# Altium PCB Car_wash_machine.PcbDoc (part 5 of 6)
Units mm, origin at the board's own origin, x right, y up, seen from the top; angles counter-clockwise.
Board outline 229.74 x 149.86 mm, 2 copper layers (Top Layer, Bottom Layer); 256 components, 170 nets, 868 pads, 731 vias.
Unrouted connection lines stored in the file: 362.
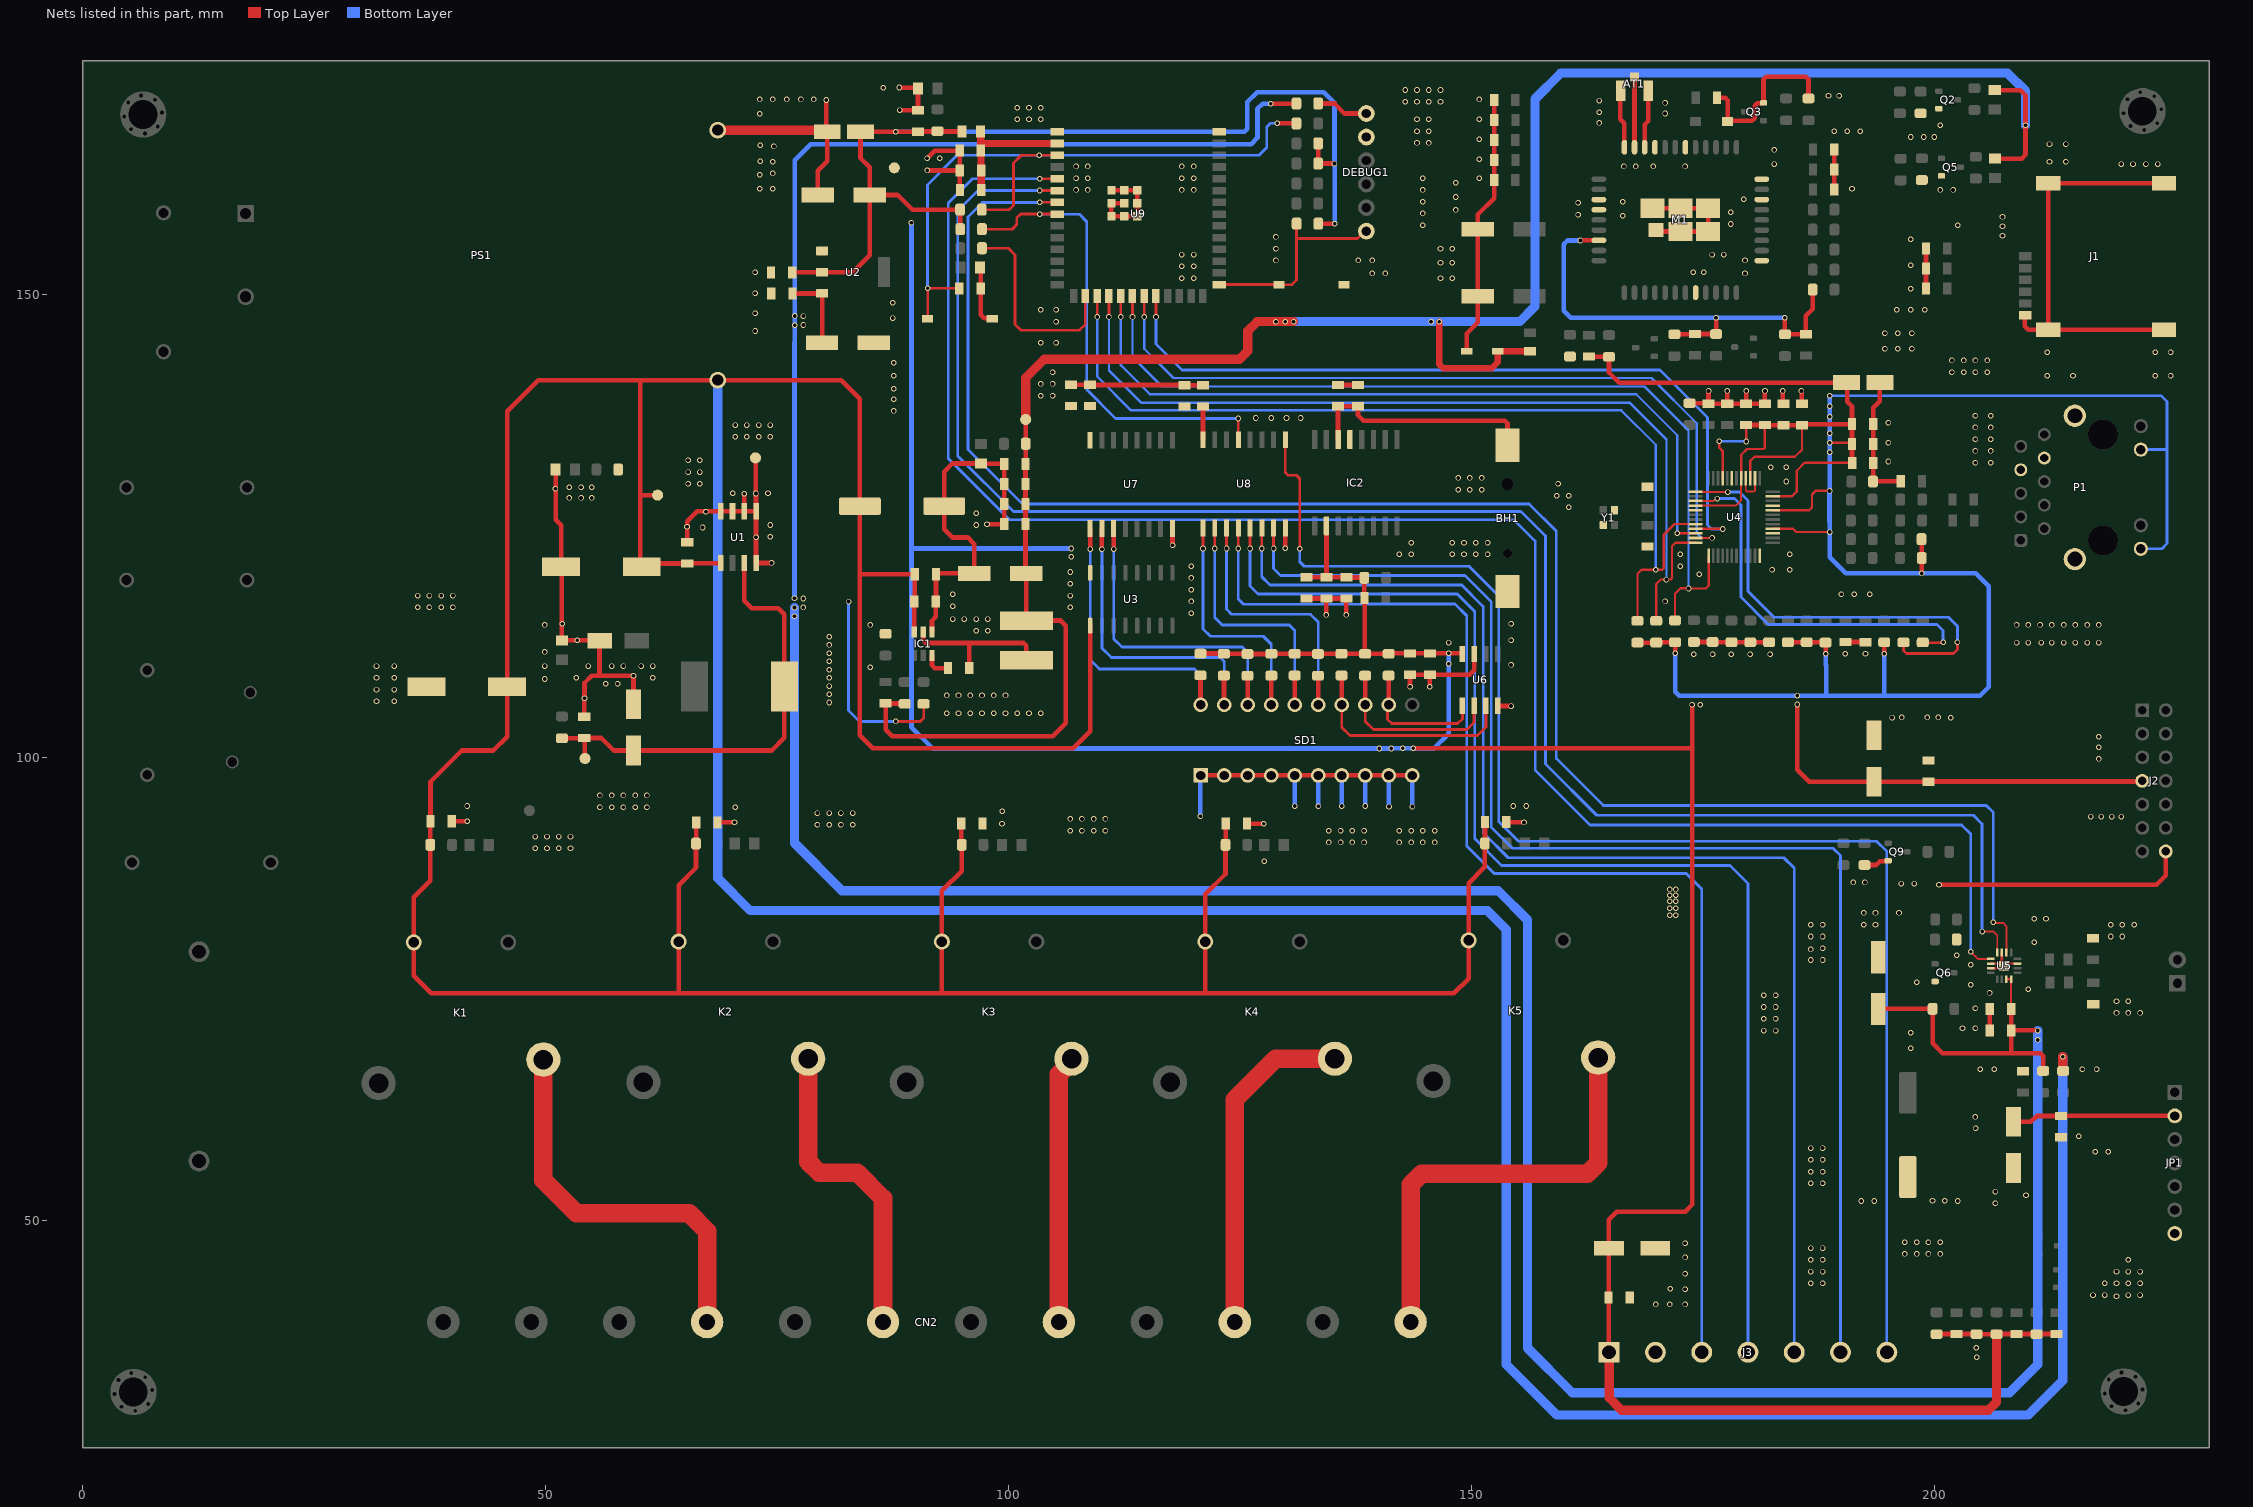
[diagram p2: the nets of this part, all layers, seen from the top]

## Via types
v1: diameter 0.6, hole 0.4, Top Layer to Bottom Layer, tented both sides, 730 vias
v2: diameter 0.6/0.6 (per signal layer), hole 0.4, Top Layer to Bottom Layer, tented both sides, 1 vias

## Nets (pads, with @x,y where several pads share a name; then routed paths per layer and width w, separated by ;. In a path a pad name is that pad's centre, name@x,y a point inside that pad or via, vN(x,y) a via of type N, cw(c..) or ccw(c..) an arc to the next point about the centre after c; other vN are vias at no path point) (continued)
ACTLED: (continued)
  Bottom Layer w0.3: v1(176.581,127.953) 178.422,127.953 179.133,127.241 179.133,117.31 182.093,114.351 200.304,114.351 200.977,113.678 v1(200.977,112.433)
BCLK: U5.16 U9.6 | length 195
  Top Layer w0.2: v1(205.194,81.178) 206.439,81.178 206.819,80.798 U5.16@206.819,78.905
  Top Layer w0.3: v1(103.391,161.226) U9.6@105.283,161.226
  Bottom Layer w0.3: v1(103.391,161.226) 96.723,161.226 94.526,159.029 94.526,132.575 100.546,126.555 155.385,126.555 158.013,123.927 158.013,99.289 163.563,93.739 204.267,93.739 205.194,92.812 v1(205.194,81.178)
BOOT_0: DEBUG1.6 R51.1 SW2.2 U9.27 | length 22.5
  Top Layer w0.3: U9.27@122.783,151.066 122.789,151.06 129.234,151.06 SW2.2@129.24,151.054 130.632,151.054 131.14,151.561 131.14,156.058 ; R51.1@131.14,157.645 131.14,156.058 ; DEBUG1.6@138.684,156.845 138.5,156.845 137.712,156.058 131.14,156.058
COM1: CN2.4 K1.COM | length 42.8
  Top Layer w2: K1.COM@49.774,67.35 49.774,54.315 53.353,50.736 65.519,50.736 67.462,48.794 CN2.4@67.462,38.989
COM2: CN2.6 K2.COM | length 34.2
  Top Layer w2: K2.COM@78.379,67.437 78.379,56.315 79.551,55.143 83.668,55.143 86.462,52.349 CN2.6@86.462,38.989
COM3: CN2.8 K3.COM | length 29
  Top Layer w2: CN2.8@105.462,38.989 105.462,65.77 106.827,67.135 K3.COM@106.827,67.437
COM4: CN2.10 K4.COM | length 36.7
  Top Layer w2: CN2.10@124.462,38.989 124.462,63.032 128.867,67.437 K4.COM@135.275,67.437
COM5: CN2.12 K5.COM | length 47.5
  Top Layer w2: CN2.12@143.462,38.989 143.462,53.845 144.634,55.016 162.551,55.016 163.723,56.188 K5.COM@163.723,67.564
DIN: U5.1 U9.5 | length 197.4
  Top Layer w0.2: v1@103.391,162.496 v1(103.391,162.509) ; v1(203.962,78.994) 204.736,78.22 U5.1@206.134,78.22
  Top Layer w0.3: v1@103.391,162.496 U9.5@105.283,162.496
  Bottom Layer w0.3: v1(103.391,162.509) 96.152,162.509 93.51,159.868 93.51,132.296 100.152,125.654 154.61,125.654 156.909,123.355 156.909,98.615 162.839,92.685 202.984,92.685 203.975,91.694 203.975,79.007 v1(203.962,78.994)
EN_MAIN: C54.2 R52.1 R80.1 SW1.2 U9.3 | length 75.2
  Top Layer w0.3: SW1.2@91.262,147.307 91.288,147.333 v1(91.288,150.66) 94.671,150.66 C54.2@94.71,150.622 ; R52.1@97.136,159.156 100.101,159.156 100.571,159.626 100.571,164.211 101.397,165.036 v1(103.34,165.036) U9.3@105.283,165.036
  Top Layer w0.5: v1(129.057,168.491) 129.07,168.478 131.108,168.478 R80.1@131.121,168.465
  Bottom Layer w0.3: v1(91.288,150.66) 91.262,150.685 91.262,161.823 94.475,165.036 v1(103.34,165.036) 127.063,165.036 127.927,165.9 127.927,168.11 128.308,168.491 v1(129.057,168.491)
ETH_CLK: U4.33 U9.22 | length 84.4
  Top Layer w0.25: U4.33@174.231,124.693 177.135,124.693 v1(177.165,124.663)
  Top Layer w0.3: U9.22@115.938,149.816 115.945,149.81 115.945,147.58 v1(115.951,147.574)
  Bottom Layer w0.3: v1(115.951,147.574) 115.951,144.653 118.77,141.834 170.396,141.834 175.514,136.715 175.514,125.095 175.946,124.663 v1(177.165,124.663)
ETH_INTN: R30.1 U4.36 U9.18 | length 98.6
  Top Layer w0.25: R30.1@169.989,114.745 169.989,117.792 169.977,117.805 169.977,118.701 170.478,119.202 171.551,119.202 171.697,119.349 171.697,122.802 172.088,123.193 U4.36@174.231,123.193
  Top Layer w0.3: U9.18@110.858,149.816 110.865,149.81 110.865,147.58 v1(110.871,147.574)
  Bottom Layer w0.25: v1(110.871,147.574) 110.871,141.783 114.338,138.316 167.107,138.316 171.088,134.335 v1(171.088,119.202)
ETH_MISO: U4.34 U9.19 | length 83.3
  Top Layer w0.25: U9.19@112.128,149.816 112.141,149.804 v1(112.141,147.574) ; v1(172.25,124.193) U4.34@174.231,124.193
  Bottom Layer w0.25: v1(112.141,147.574) 112.141,142.367 115.291,139.217 167.831,139.217 172.25,134.798 v1(172.25,124.193)
ETH_MOSI: U4.35 U9.21 | length 84.2
  Top Layer w0.25: U9.21@114.668,149.816 U9.21@114.681,149.804 ; U4.35@174.231,123.693 174.234,123.696 176.02,123.696 v1(176.022,123.698)
  Top Layer w0.3: v1(114.681,147.574) U9.21@114.681,149.804
  Bottom Layer w0.25: v1(114.681,147.574) 114.681,144.145 117.843,140.983 169.481,140.983 174.371,136.093 174.371,124.206 174.879,123.698 v1(176.022,123.698)
ETH_RST: R26.1 U4.37 U9.20 | length 97.1
  Top Layer w0.25: U9.20@113.398,149.816 U9.20@113.411,149.804 ; R26.1@172.022,114.776 172.022,117.669 172.615,118.262 173.457,118.262 v1(173.482,118.237) 175.333,118.237 175.661,118.565 U4.37@175.661,121.763
  Top Layer w0.3: v1(113.411,147.574) U9.20@113.411,149.804
  Bottom Layer w0.25: v1(113.411,147.574) 113.411,143.256 116.611,140.056 168.732,140.056 173.482,135.306 v1(173.482,118.237)
ETH_SCSN: R32.1 U4.32 U9.17 | length 101.3
  Top Layer w0.25: R32.1@167.957,114.745 167.97,114.757 167.97,119.837 168.402,120.269 v1@170.003,120.269 ; v1(169.926,120.269) 170.669,120.269 170.815,120.415 170.815,124.054 171.955,125.193 U4.32@174.231,125.193
  Top Layer w0.3: U9.17@109.588,149.816 109.595,149.81 109.595,147.58 v1(109.601,147.574)
  Bottom Layer w0.25: v1(109.601,147.574) 109.601,141.135 113.259,137.477 166.205,137.477 169.926,133.756 169.926,128.19 v1(169.926,120.269)
GND: AT1.2 BH1.2 C1.2 C2.2 C3.2 C4.2 C7.2 C8.2 C9.2 C10.2 C11.2 C12.2 C13.2 C14.2 C15.2 C16.1 C17.1 C18.1 C19.1 C20.1 C22.2 C23.1 C24.1 C25.1 C26.1 C27.1 C30.2 C31.2 C32.2 C33.2 C34.2 C37.2 C38.2 C39.2 C40.2 C41.2 C42.2 C43.2 C44.2 C45.2 C46.2 C47.2 C48.2 C49.2 C50.2 C51.2 C52.2 C53.2 C54.1 C55.2 C56.2 C57.2 C58.2 C59.2 C60.2 C61.2 C62.2 C63.2 C64.2 C65.2 C66.2 C68.2 C69.2 C73.2 C74.2 C75.2 C76.2 C77.2 C78.2 C79.2 C80.2 C81.2 C82.2 C83.2 C84.2 C85.2 C86.2 D1.1 D2.2 D3.2 D4.2 D5.2 D6.1 D8.1 D15.2 DEBUG1.2 EC1.2 EC2.2 EC3.2 EC4.2 EC5.2 EC6.2 GND.0@72.682,132.347 IC1.1 IC2.13 J1.C5 J1.G1 J1.G2 J1.G3 J1.G4 J3.2 JP1.7 M1.8 M1.13 M1.19 M1.21 M1.27 M1.30 M1.31 M1.33 M1.36 M1.37 M1.87 M1.88 M1.89 M1.90 M1.91 M1.92 P1.7 P1.8 P1.Shell PS1.3 Q2.2 Q3.2 Q5.2 Q6.2 Q9.2 R7.1 R13.2 R16.2 R18.2 R19.2 R24.2 R27.1 R36.1 R37.1 R38.1 R44.1 R48.1 R57.1 R83.1 SD1.1A SD1.2A SD1.3A SD1.4A SD1.5A SD1.6A SD1.7A SD1.8A SD1.9A SD1.10A SW1.1 SW2.1 U1.4 U1.5 U1.6 U1.7 U1.8 U2.1 U3.8 U4.3 U4.9 U4.14 U4.16 U4.19 U4.29 U4.48 U5.2 U5.3 U5.11 U5.15 U5.17 U6.4 U6.7 U7.8 U8.8 U9.1 U9.40 U9.41 U9.42 U9.43 U9.44 U9.45 U9.46 U9.47 U9.48 U9.49 Y1.2 Y1.4 | length 440.2
  Top Layer w0.2: U4.16@179.661,130.123 179.661,128.835 179.778,128.718 180.544,128.718 180.661,128.835 U4.14@180.661,130.123
  Top Layer w0.25: U5.3@206.134,77.22 207.319,77.22 U5.17@207.569,77.47 ; U5.2@206.134,77.72 U5.17@207.319,77.72 ; U5.15@207.319,78.905 U5.17@207.319,77.72 ; U5.11@209.004,77.72 207.819,77.72 U5.17@207.569,77.47 ; U5.17@207.319,77.72 U5.17@207.569,77.47
  Top Layer w0.5: C38.2@39.878,93.091 v1(41.542,93.091) ; D2.2@51.096,131.115 51.096,125.662 51.701,125.057 C1.2@51.701,120.587 51.778,120.51 D3.2@51.778,112.632 55.84,112.632 55.84,108.801 ; C4.2@54.191,104.388 54.204,104.401 54.204,106.375 v1(54.216,106.388) 54.216,108.026 54.991,108.801 55.84,108.801 ; C3.2@59.525,105.738 59.512,105.751 v1(59.512,108.801) 55.84,108.801 ; C2.2@65.316,123.242 65.316,125.501 66.395,126.58 U1.8@68.936,126.58 U1.7@70.206,126.58 U1.6@71.476,126.58 ; C42.2@68.587,92.964 68.593,92.97 70.415,92.97 v1(70.421,92.977) ; v1(71.476,128.486) U1.6@71.476,126.58 ; GND.0@72.682,132.347 72.733,132.296 v1@72.733,128.526 ; v1(72.733,128.499) 72.739,128.492 72.739,126.587 U1.5@72.746,126.58 ; v1(74.422,120.993) 72.758,120.993 U1.4@72.746,120.98 v1(72.746,123.78) U1.5@72.746,126.58 ; EC3.2@79.427,160.744 79.427,163.374 80.433,164.38 C75.2@80.433,167.576 C75.2@80.34,167.669 ; C75.2@80.263,167.746 C75.2@80.34,167.669 ; v1(80.34,171.005) C75.2@80.34,167.669 ; v1(88.211,172.355) 88.23,172.336 90.181,172.336 D5.2@90.254,172.263 90.244,172.252 90.244,169.898 C79.2@90.233,169.888 90.221,169.901 88.278,169.901 v1(88.265,169.913) ; v1(91.224,164.706) 92.05,165.532 C77.2@94.735,165.532 94.748,165.519 C76.2@94.748,163.386 ; v1(91.249,163.398) 91.262,163.386 C76.2@94.748,163.386 ; IC1.1@91.755,113.523 91.755,114.767 92.151,115.164 92.151,116.834 C8.2@92.146,116.84 92.184,116.878 C9.2@92.184,119.774 92.273,119.863 EC1.2@96.33,119.863 96.33,123.037 95.618,123.749 93.955,123.749 93.069,124.634 C7.2@93.069,127.127 93.069,130.864 93.946,131.741 D4.2@97.041,131.741 97.062,131.72 99.54,131.72 C13.2@99.561,131.699 C12.2@99.561,129.54 C11.2@99.561,127.381 C10.2@99.561,125.222 99.517,125.178 v1(97.695,125.178) ; C78.2@94.773,161.277 94.767,161.284 94.767,163.366 C76.2@94.76,163.373 C76.2@94.748,163.386 ; D15.2@96.926,152.933 97.01,152.85 C54.1@97.01,150.622 97.01,147.796 97.396,147.409 98.242,147.409 SW1.1@98.267,147.383 ; C55.2@106.794,140.24 C56.2@108.814,140.24 108.839,140.215 118.986,140.215 C57.2@119.012,140.19 C58.2@121.031,140.19 ; U9.42@111.133,161.256 U9.49@112.533,161.256 U9.48@113.933,161.256 U9.47@113.933,159.857 U9.46@113.933,158.457 U9.45@112.533,158.457 U9.44@111.133,158.457 U9.43@111.133,159.857 U9.41@112.533,159.857 ; U7.8@117.729,124.714 117.735,124.708 117.735,122.917 v1(117.742,122.911) ; SD1.1A@120.777,98.044 SD1.2A@123.317,98.044 SD1.3A@125.857,98.044 SD1.4A@128.397,98.044 SD1.5A@130.937,98.044 SD1.6A@133.477,98.044 SD1.7A@136.017,98.044 SD1.8A@138.557,98.044 ; C52.2@125.801,92.824 v1(127.597,92.824) ; v1(129.921,122.58) U8.8@129.921,124.765 ; C80.2@132.207,117.155 C81.2@134.366,117.155 ; v1(134.341,115.379) 134.353,115.392 134.353,117.143 C81.2@134.366,117.155 ; C73.2@135.611,140.222 C74.2@137.77,140.222 ; v1(136.512,115.379) 136.519,115.386 136.519,117.149 C82.2@136.525,117.155 C81.2@134.366,117.155 ; SD1.8A@138.557,98.336 SD1.8A@138.557,98.044 ; v1(143.396,107.62) 143.396,108.908 C60.2@143.383,108.921 C59.2@145.542,108.921 ; SD1.10A@143.65,98.057 SD1.10A@143.637,98.044 SD1.9A@141.097,98.044 SD1.8A@138.557,98.044 ; v1(145.529,107.62) 145.536,107.626 145.536,108.915 C59.2@145.542,108.921 ; D6.1@149.511,143.857 149.511,145.777 150.699,146.965 EC4.2@150.699,149.809 EC5.2@150.699,157.048 150.699,158.636 152.475,160.412 C20.1@152.475,162.382 152.478,162.386 152.478,164.538 C19.1@152.482,164.541 152.478,164.545 152.478,166.697 C18.1@152.475,166.7 152.478,166.704 152.478,168.856 C17.1@152.482,168.859 152.478,168.863 152.478,171.015 C16.1@152.475,171.018 ; U6.7@150.317,111.175 150.343,111.15 150.343,109.423 149.84,108.921 C59.2@145.542,108.921 ; U6.4@152.857,105.575 152.895,105.537 v1(154.305,105.537) ; C53.2@153.797,92.989 153.81,92.977 155.689,92.977 v1(155.702,92.964) ; AT1.2@166.165,171.996 166.116,171.947 166.116,168.91 166.543,168.483 M1.33@166.543,165.896 ; M1.31@168.743,165.896 168.743,168.362 169.115,168.734 AT1.2@169.115,171.996 ; M1.92@169.593,159.296 M1.91@172.593,159.296 M1.90@175.593,159.296 M1.89@175.593,156.796 M1.88@172.593,156.796 170.154,156.796 M1.87@169.972,156.978 ; R37.1@173.596,138.253 173.621,138.228 C27.1@175.603,138.228 ; R24.2@174.053,112.459 R19.2@176.085,112.459 176.101,112.443 178.102,112.443 R18.2@178.118,112.427 R16.2@180.149,112.427 R13.2@182.181,112.427 ; v1(175.641,139.573) 175.635,139.567 175.635,138.259 C27.1@175.603,138.228 ; C37.2@176.55,171.247 177.431,171.247 177.724,170.954 177.724,168.743 180.336,168.743 180.629,169.036 180.629,170.377 180.921,170.67 181.563,170.67 Q3.2@181.579,170.686 181.579,173.227 181.871,173.52 186.143,173.52 186.436,173.227 R44.1@186.436,171.171 ; v1(177.673,139.573) 177.673,138.215 C26.1@177.66,138.203 ; v1(179.705,139.573) 179.699,139.567 179.699,138.209 C45.2@179.689,138.199 ; v1(181.737,139.573) 181.731,139.567 181.731,138.202 C49.2@181.724,138.196 C45.2@179.692,138.196 C45.2@179.689,138.199 ; v1@183.642,139.546 183.642,138.259 C46.2@183.718,138.183 ; v1(185.674,139.573) 185.693,139.554 185.693,138.215 C50.2@185.725,138.183 ; C22.2@189.219,161.315 C23.1@189.219,163.474 C24.1@189.219,165.633 ; C34.2@190.424,112.457 190.43,112.451 192.576,112.451 C25.1@192.583,112.444 ; R83.1@192.494,88.36 193.732,88.36 194.161,88.789 194.99,88.789 Q9.2@195.04,88.839 ; R27.1@193.402,129.794 R27.1@193.415,129.807 ; C43.2@194.145,140.475 194.145,138.468 193.441,137.764 C44.2@193.441,136.004 C48.2@193.441,133.845 193.444,133.842 193.444,131.817 C47.2@193.448,131.813 193.425,131.791 193.425,129.817 R27.1@193.415,129.807 ; C33.2@196.404,129.819 196.391,129.807 R27.1@193.415,129.807 ; C32.2@199.123,150.62 C30.2@199.123,152.779 C31.2@199.123,154.938 ; C68.2@206.031,70.51 C69.2@206.031,72.796 ; J1.C5@209.832,147.76 209.804,147.732 209.804,146.558 210.162,146.2 J1.G1@212.332,146.2 ; J1.G3@224.852,146.2 J1.G1@212.332,146.2 ; J1.G4@224.852,162 J1.G2@212.332,162 J1.G1@212.332,146.2 ; U1.6@71.476,126.58 U1.5@72.746,126.58 ; C27.1@175.603,138.228 C27.1@175.628,138.203 C26.1@177.66,138.203 ; C26.1@177.66,138.203 177.664,138.199 C45.2@179.689,138.199
  Top Layer w1: PS1.3@68.612,167.746 C75.2@80.263,167.746
  Bottom Layer w0.5: v1(120.752,93.637) 120.752,98.019 SD1.1A@120.777,98.044 ; v1(130.937,94.729) SD1.5A@130.937,98.044 ; SD1.6A@133.477,98.044 133.49,98.031 133.49,94.729 v1(133.502,94.717) ; SD1.7A@136.017,98.044 136.023,98.038 136.023,94.736 v1(136.03,94.729) ; SD1.8A@138.557,98.044 138.563,98.038 138.563,94.748 v1(138.57,94.742) ; SD1.9A@141.097,98.044 141.11,98.031 141.11,94.691 v1(141.122,94.678) ; SD1.10A@143.637,98.044 143.643,98.038 143.643,94.685 v1(143.65,94.678)
  other v1: 169.926,40.894 171.45,40.894 173.101,40.894 219.71,41.783 217.17,41.91 218.44,41.91 220.98,41.91 222.25,41.91 173.101,42.545 171.513,42.596 186.69,43.18 187.96,43.18 218.44,43.18 219.71,43.18 220.98,43.18 222.25,43.18 173.101,44.196 186.69,44.45 187.96,44.45 219.71,44.45 220.98,44.45 222.25,44.45 186.69,45.72 187.96,45.72 220.98,45.72 173.101,45.974 196.85,46.355 198.12,46.355 199.39,46.355 200.66,46.355 186.69,46.99 187.96,46.99 173.101,47.498 196.85,47.625 198.12,47.625 199.39,47.625 200.66,47.625 206.629,51.816 192.151,52.07 193.548,52.07 202.565,52.07 199.834,52.108 201.168,52.108 209.931,52.705 206.629,53.086 186.69,53.975 187.96,53.975 186.69,55.245 187.96,55.245 186.69,56.515 187.96,56.515 217.424,57.404 218.821,57.404 186.69,57.785 187.96,57.785 215.646,59.055 204.978,66.294 206.502,66.294 216.027,66.294 217.551,66.294 197.485,68.58 197.485,70.231 181.61,70.485 182.88,70.485 203.073,70.739 204.47,70.739 181.61,71.755 182.88,71.755 219.71,72.39 220.98,72.39 222.25,72.39 204.47,72.898 181.61,73.025 182.88,73.025 219.71,73.66 220.98,73.66 181.61,74.295 182.88,74.295 205.994,74.549 210.185,74.93 203.962,75.438 198.12,75.692 203.962,77.597 186.69,78.105 187.96,78.105 202.438,78.613 186.69,79.248 187.96,79.375 210.82,80.01 186.69,80.645 187.96,80.645 219.075,80.645 220.345,80.645 186.69,81.915 187.96,81.915 192.405,81.915 193.675,81.915 219.075,81.915 220.345,81.915 221.615,81.915 210.82,82.55 212.09,82.55 171.45,82.931 172.085,82.931 192.405,83.185 193.675,83.185 196.215,83.185 171.45,83.693 172.085,83.693 171.45,84.455 172.085,84.455 171.45,85.09 172.085,85.09 171.45,85.725 172.085,85.725 196.469,86.36 197.866,86.36 191.262,86.487 192.532,86.487 127.635,88.773 48.895,90.17 50.165,90.17 51.435,90.17 52.705,90.17 134.62,90.805 135.89,90.805 137.16,90.805 138.43,90.805 142.24,90.805 143.51,90.805 144.78,90.805 146.05,90.805 48.895,91.44 50.165,91.44 51.435,91.44 52.705,91.44 106.68,92.075 107.95,92.075 109.22,92.075 110.49,92.075 134.62,92.075 135.89,92.075 137.16,92.075 138.43,92.075 142.24,92.075 143.51,92.075 144.78,92.075 146.05,92.075 79.375,92.71 80.645,92.71 81.915,92.71 83.185,92.71 99.314,92.837 106.68,93.345 107.95,93.345 109.22,93.345 110.49,93.345 216.916,93.599 218.059,93.599 219.202,93.599 220.218,93.599 79.375,93.98 80.645,93.98 81.915,93.98 83.185,93.98 99.341,94.178 55.88,94.615 57.15,94.615 58.42,94.615 59.69,94.615 60.96,94.615 70.485,94.615 41.529,94.742 154.559,94.742 155.956,94.742 55.88,95.885 57.15,95.885 58.42,95.885 59.69,95.885 60.96,95.885 217.805,99.822 217.805,101.092 217.805,102.235 201.803,104.267 195.466,104.292 196.52,104.305 199.25,104.305 200.444,104.305 93.345,104.775 94.615,104.775 95.885,104.775 97.155,104.775 98.425,104.775 99.695,104.775 100.965,104.775 102.235,104.775 103.505,104.775 80.645,105.918 31.75,106.045 33.655,106.045 93.345,106.68 94.615,106.68 95.885,106.68 97.155,106.68 98.425,106.68 99.695,106.68 80.645,106.807 31.75,107.315 33.655,107.315 80.645,107.696 56.515,107.95 57.785,107.95 49.911,108.458 31.75,108.585 33.655,108.585 53.34,108.585 61.595,108.585 80.645,108.585 80.645,109.474 85.09,109.728 31.75,109.855 33.655,109.855 49.911,109.855 54.61,109.855 57.15,109.855 58.42,109.855 60.325,109.855 61.595,109.855 154.305,109.982 80.645,110.363 174.053,111.125 178.105,111.125 180.124,111.125 182.283,111.125 176.073,111.138 192.595,111.176 190.411,111.188 80.645,111.252 49.911,111.379 80.645,112.141 208.915,112.395 210.185,112.395 211.582,112.395 212.725,112.395 213.995,112.395 215.265,112.395 216.535,112.395 217.805,112.395 53.442,112.649 154.305,112.649 80.645,113.03 96.52,113.665 97.79,113.665 49.911,114.3 85.09,114.3 208.915,114.3 210.185,114.3 211.455,114.3 212.725,114.3 213.995,114.3 215.265,114.3 216.535,114.3 217.805,114.3 51.816,114.414 154.305,114.427 93.98,114.935 95.25,114.935 96.52,114.935 97.79,114.935 119.761,115.57 36.195,116.205 37.465,116.205 38.735,116.205 40.005,116.205 106.68,116.205 93.98,116.332 119.761,116.84 170.942,116.84 36.195,117.475 37.465,117.475 38.735,117.475 40.005,117.475 106.68,117.475 93.98,117.602 189.992,117.602 191.389,117.602 193.04,117.602 119.761,118.11 106.68,118.745 119.761,119.38 174.625,119.761 106.68,120.015 182.499,120.269 184.404,120.269 119.761,120.65 172.593,120.65 142.24,121.92 143.51,121.92 147.955,121.92 149.225,121.92 150.495,121.92 151.765,121.92 172.593,121.92 184.404,121.92 143.51,123.19 147.955,123.19 149.225,123.19 150.495,123.19 151.765,123.19 74.295,123.825 66.973,124.826 65.291,124.904 74.295,125.095 96.52,125.095 96.52,126.365 67.335,126.53 160.528,127 52.578,128.016 53.848,128.016 54.991,128.016 159.258,128.27 160.528,128.27 70.231,128.524 74.041,128.524 148.59,128.905 149.86,128.905 151.13,128.905 51.079,129.007 52.578,129.159 53.848,129.159 54.991,129.159 65.405,129.54 66.675,129.54 159.385,129.54 184.023,129.794 148.59,130.175 149.86,130.175 65.405,130.81 66.675,130.81 182.372,131.318 184.023,131.318 204.47,131.826 206.121,131.826 195.072,131.953 65.405,132.08 66.675,132.08 204.47,133.096 206.121,133.096 195.072,133.985 204.47,134.366 206.121,134.366 70.485,134.62 71.755,134.62 73.025,134.62 74.295,134.62 204.47,135.636 206.121,135.636 70.485,135.89 71.755,135.89 73.025,135.89 74.295,135.89 195.072,136.144 126.746,136.652 128.397,136.652 130.048,136.652 131.572,136.652 204.47,136.906 206.121,136.906 87.63,137.414 87.63,138.684 103.505,139.065 104.775,139.065 183.642,139.573 87.63,139.827 103.505,140.335 104.775,140.335 87.63,141.224 212.217,141.224 215.011,141.224 223.901,141.224 225.552,141.224 104.775,141.605 201.93,141.605 203.2,141.605 204.47,141.605 205.74,141.605 87.63,142.621 201.93,142.875 203.2,142.875 204.47,142.875 205.74,142.875 212.217,143.764 223.901,143.764 225.552,143.764 194.691,144.145 196.088,144.145 197.612,144.145 103.505,144.78 105.156,144.78 194.691,145.796 196.088,145.796 197.612,145.796 72.644,146.05 105.156,147.066 87.503,147.447 72.644,147.955 103.505,148.336 105.156,148.336 195.961,148.336 197.485,148.336 199.009,148.336 87.503,149.098 72.644,150.114 197.485,150.622 118.745,151.765 120.015,151.765 146.685,151.765 147.955,151.765 139.319,152.273 140.716,152.273 179.578,152.273 72.644,152.4 173.99,152.4 175.133,152.4 118.745,153.035 120.015,153.035 197.485,153.162 146.685,153.416 147.955,153.416 128.905,153.67 137.795,153.67 139.319,153.67 179.578,153.67 118.745,154.305 120.015,154.305 176.022,154.305 177.292,154.305 128.905,154.94 146.685,154.94 147.955,154.94 197.485,155.956 128.905,156.21 207.391,156.337 207.391,157.353 144.78,157.48 202.565,157.48 178.054,157.607 207.391,158.369 166.37,158.496 161.544,158.623 144.78,158.75 178.054,158.877 148.336,159.131 161.544,159.893 144.78,160.02 166.37,160.02 179.451,160.274 148.336,160.528 107.315,161.29 108.585,161.29 118.745,161.29 120.015,161.29 144.78,161.29 200.66,161.29 202.057,161.29 73.152,161.417 74.549,161.417 191.135,161.417 148.336,162.052 107.315,162.56 108.585,162.56 118.745,162.56 120.015,162.56 144.78,162.56 150.876,162.56 73.152,162.941 74.549,163.068 107.315,163.83 108.585,163.83 118.745,163.83 120.015,163.83 166.497,163.83 167.767,163.83 169.672,163.83 173.101,163.83 182.753,164.084 220.218,164.084 221.488,164.084 222.885,164.084 224.155,164.084 74.549,164.338 212.471,164.338 214.249,164.338 73.19,164.401 150.876,164.592 92.583,164.719 182.753,165.608 74.676,165.989 73.19,166.103 212.471,166.243 214.249,166.243 144.145,166.37 145.415,166.37 150.876,166.751 197.485,167.005 198.882,167.005 200.025,167.005 144.145,167.64 145.415,167.64 189.23,167.64 190.627,167.64 192.024,167.64 200.66,168.275 163.83,168.529 100.965,168.91 102.235,168.91 103.505,168.91 144.145,168.91 145.415,168.91 150.876,168.91 73.152,169.52 170.942,169.545 163.83,169.672 100.965,170.18 102.235,170.18 103.505,170.18 170.942,170.688 142.875,170.815 144.145,170.815 145.415,170.815 146.685,170.815 163.83,170.942 73.152,171.069 74.549,171.069 76.073,171.069 77.597,171.069 78.994,171.069 150.876,171.069 188.595,171.45 189.738,171.45 142.875,172.085 144.145,172.085 145.415,172.085 146.685,172.085 86.487,172.339
  other v2: 151.13,130.175
IN1: J3.3 U8.4 | length 135.3
  Top Layer w0.3: v1(124.841,122.555) U8.4@124.841,124.765
  Bottom Layer w0.3: v1(124.841,122.555) 124.841,117.094 125.4,116.535 138.532,116.535 138.557,116.561 148.247,116.561 149.517,115.291 149.517,90.424 152.489,87.452 173.228,87.452 174.901,85.78 J3.3@174.901,35.738
IN2: J3.4 U8.5 | length 138.4
  Top Layer w0.3: v1(126.111,122.555) U8.5@126.111,124.765
  Bottom Layer w0.3: v1(126.111,122.555) 126.111,118.491 126.975,117.627 148.488,117.627 150.393,115.722 150.393,91.199 153.276,88.316 177.952,88.316 179.901,86.368 J3.4@179.901,35.883 ; J3.4@179.756,35.883 J3.4@179.901,35.738
IN3: J3.5 U8.6 | length 142.4
  Top Layer w0.3: v1(127.381,122.555) U8.6@127.381,124.765
  Bottom Layer w0.3: v1(127.381,122.555) 127.381,119.507 128.27,118.618 148.984,118.618 151.295,116.307 151.295,91.859 154,89.154 183.769,89.154 184.901,88.022 J3.5@184.901,35.738
IN4: J3.6 U8.7 | length 146.4
  Top Layer w0.3: v1(128.651,122.555) U8.7@128.651,124.765
  Bottom Layer w0.3: v1(128.651,122.555) 128.651,120.396 129.413,119.634 149.339,119.634 152.159,116.815 152.159,92.481 154.47,90.17 189.103,90.17 189.901,89.372 189.901,86.233 J3.6@189.901,35.738
IN5: J3.7 U8.9 | length 159.1
  Top Layer w0.3: U8.9@129.921,134.315 129.921,130.779 130.22,130.48 131.096,130.48 131.483,130.093 v1(131.483,122.53)
  Bottom Layer w0.3: v1(131.483,122.53) 131.483,121.12 131.966,120.637 149.746,120.637 152.984,117.399 152.984,93.04 155.092,90.932 193.802,90.932 194.901,89.833 J3.7@194.901,35.738
INT: R65.1 U8.13 U9.8 | length 52.7
  Top Layer w0.3: R65.1@97.149,157.048 100.419,157.048 100.901,157.531 100.901,158.255 101.346,158.699 103.378,158.699 v1(103.403,158.674) 103.41,158.68 105.277,158.68 U9.8@105.283,158.686 ; U8.13@124.841,134.315 v1(124.841,136.601)
  Bottom Layer w0.3: v1(103.403,158.674) 107.658,158.674 108.474,157.858 108.474,139.722 111.595,136.601 v1(124.841,136.601)
LED: R58.2 U9.16 | length 22.5
  Top Layer w0.3: R58.2@97.155,154.991 100,154.991 100.724,154.267 100.724,146.761 101.346,146.139 107.696,146.139 108.318,146.761 U9.16@108.318,149.816
LINKLED: R34.2 U4.25 | length 49.6
  Top Layer w0.2: U4.25@174.231,128.693 174.252,128.672 177.703,128.672 v1(177.724,128.651)
  Top Layer w0.3: R34.2@196.698,112.414 196.698,111.542 197.013,111.227 202.095,111.227 202.527,111.658 v1(202.527,112.433)
  Bottom Layer w0.3: v1(177.724,128.651) 178.994,128.651 179.908,127.737 179.908,117.932 182.715,115.126 201.562,115.126 202.527,114.16 v1(202.527,112.433)
LRCLK: U5.14 U9.7 | length 193.1
  Top Layer w0.2: v1(206.4,82.194) 206.477,82.118 207.455,82.118 207.819,81.754 U5.14@207.819,78.905
  Top Layer w0.3: v1(103.391,159.944) 103.391,159.957 U9.7@105.283,159.957
  Bottom Layer w0.3: v1(103.391,159.944) 97.193,159.944 95.631,158.382 95.631,133.248 101.524,127.356 156.261,127.356 159.195,124.422 159.195,99.885 164.274,94.805 205.638,94.805 206.4,94.043 v1(206.4,82.194)
NetAT1_1: AT1.1 M1.32 | length 7.6
  Top Layer w0.5: AT1.1@167.64,173.496 167.641,173.495 167.641,165.898 M1.32@167.643,165.896
NetBH1_1: BH1.1 C73.1 C74.1 IC2.14 | length 25.6
  Top Layer w0.5: IC2.14@135.636,134.322 135.611,134.322 C73.1@135.611,137.922 C74.1@137.77,137.922 137.77,136.969 138.367,136.373 153.631,136.373 153.924,136.08 BH1.1@153.924,133.697
NetC5_1: C5.1 IC1.6 | length 3
  Top Layer w0.5: IC1.6@91.775,110.993 IC1.6@91.755,111.013 91.755,109.932 92.048,109.639 C5.1@93.49,109.639 C5.1@93.47,109.659
NetC5_2: C5.2 IC1.2 L3.1 | length 16.6
  Top Layer w0.5: IC1.2@90.85,113.478 IC1.2@90.805,113.523 90.805,112.637 91.098,112.344 95.79,112.344 101.663,112.344 101.956,112.051 L3.1@101.956,110.474 ; 95.733,112.344 95.79,112.286 C5.2@95.79,109.639